# Altium PCB PCB_USB_Board_v2.3.PcbDoc
Units mil, origin at the board's own origin, x right, y up, seen from the top; angles counter-clockwise.
Board outline 652.87 x 1133.86 mil, 2 copper layers (Top Layer, Bottom Layer), stack 61.811 mil thick; 8 components, 4 nets, 40 pads, 15 vias.
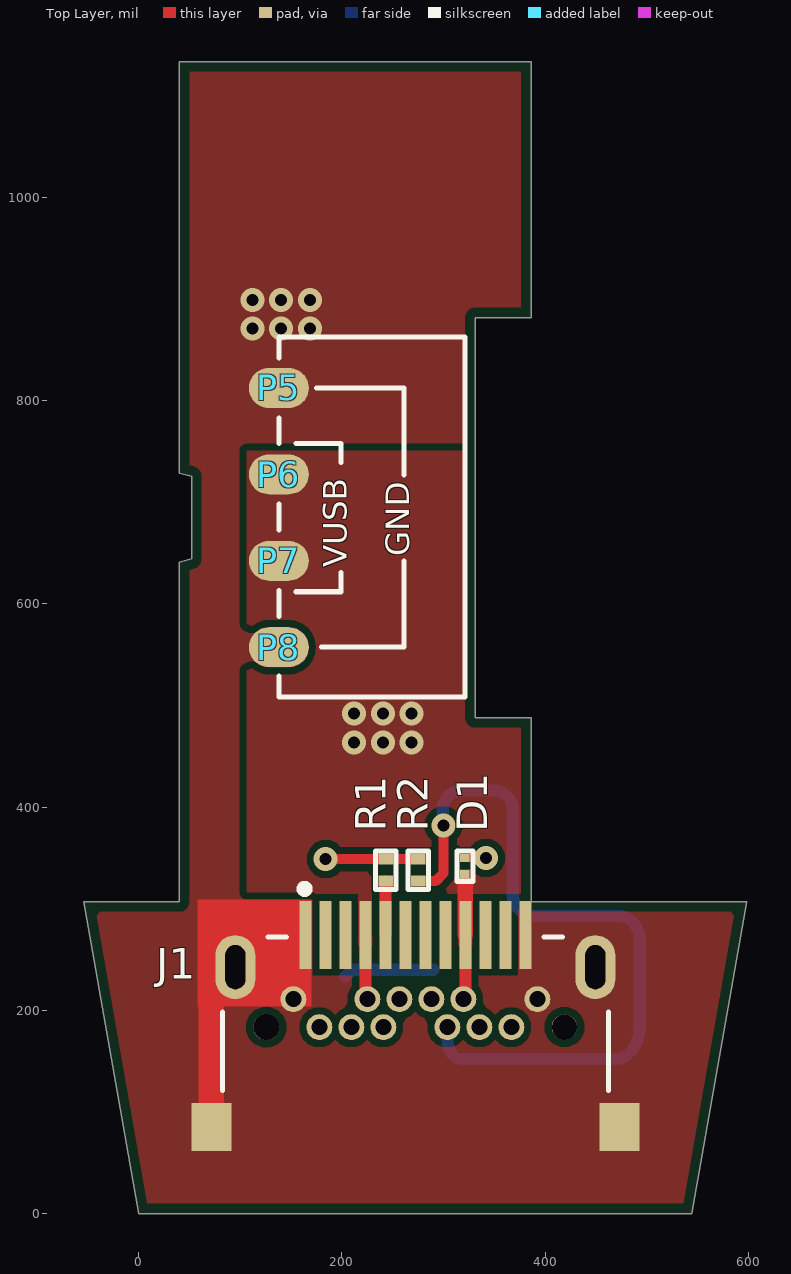
[diagram p0: Top Layer view]
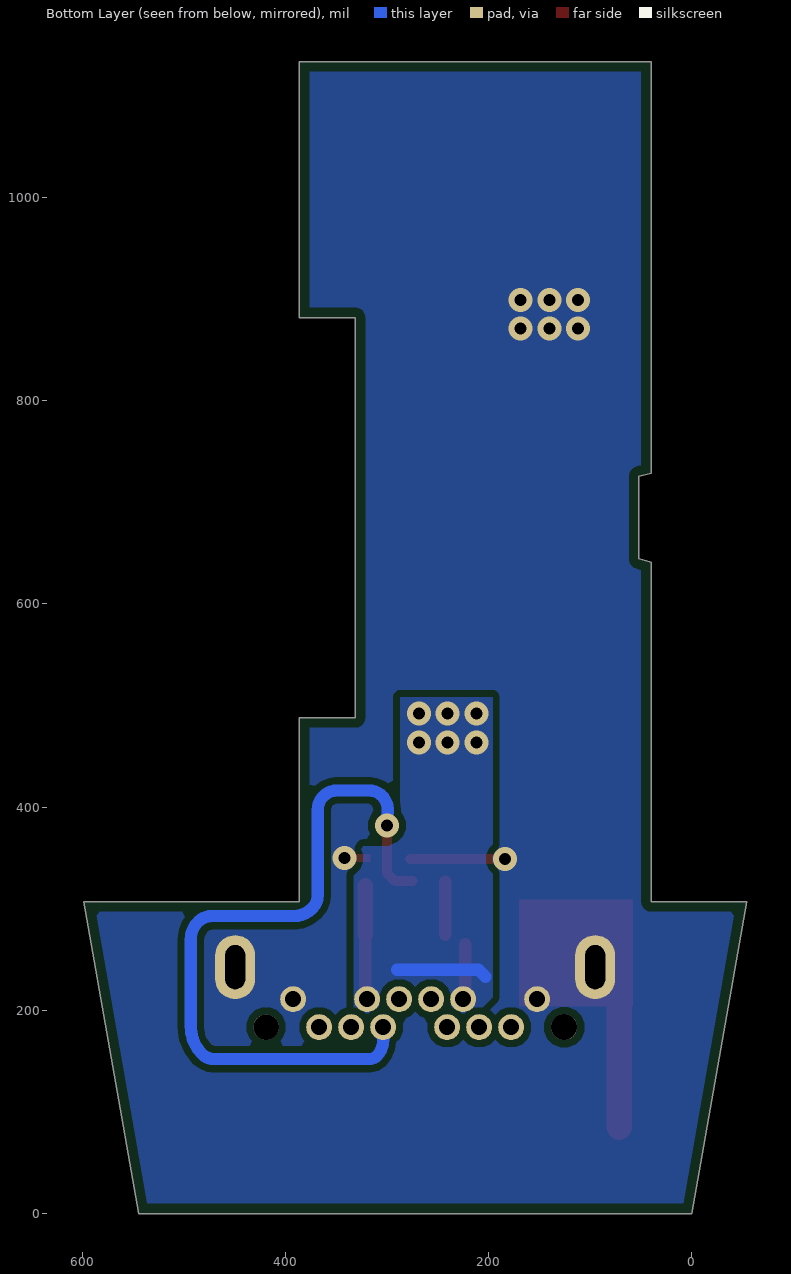
[diagram p1: Bottom Layer view, seen from below]
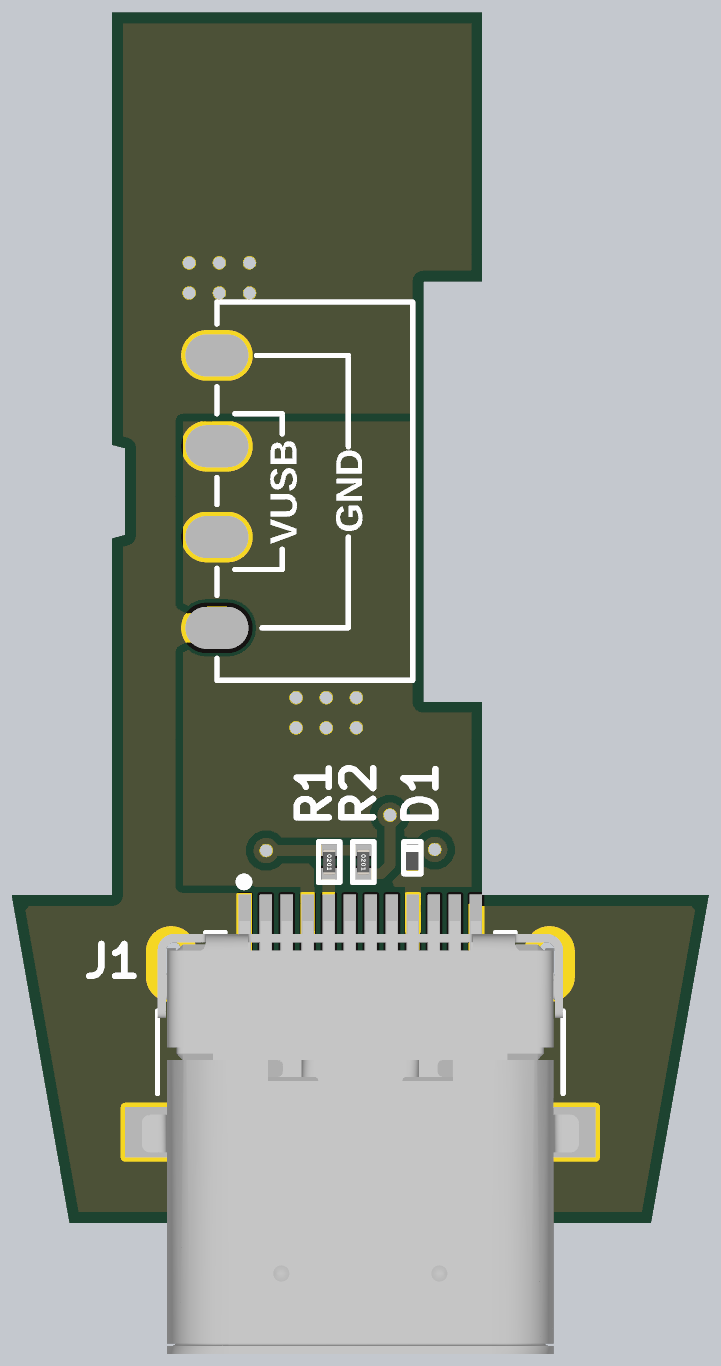
[diagram p2: 3D render of the assembled board from above, using the file's embedded part models]

## Layer stack, top to bottom
Top Solder: solder mask 0.3937, Solder Resist, Dk 3.5
Top Layer: signal copper 1.378
Dielectric 1: core 59.0551, FR-4, Dk 4.8
Bottom Layer: signal copper 1.378
Bottom Solder: solder mask 0.3937, Solder Resist, Dk 3.5

## Board outline
-0.17,-0.08 -54.31,307.01 39.84,307.01 39.84,641.16 52,644.41 52,725.5 39.84,728.76 39.84,1133.78 386.29,1133.78 386.29,881.81 331.17,881.81 331.17,488.11 386.29,488.11 386.29,307.01 598.55,307.01 544.41,-0.08 441,-0.08 440.75,-0.08 59.75,-0.08 60,-0.08

## Design rules (kind name [scope] priority, off if disabled: settings)
BoardOutlineClearance [All] p1: gap=0 ignorepadtopadclearanceinfootprint=FALSE except(10: Poly-OutlineEdge)
Clearance [All] p1: gap=7 ignorepadtopadclearanceinfootprint=FALSE except(5: Arc-SMDPad Track-SMDPad SMDPad-SMDPad THPad-THPad)
HoleSize [All] p1: absolutevalues=TRUE maxlimit=1000 minlimit=1 maxpercent=80.000 minpercent=20.000
HoleToHoleClearance [All] p1: gap=2 allowstackedmicrovias=TRUE
MinimumSolderMaskSliver [All] p1: minsoldermaskwidth=2
PolygonConnect [All] p1: connectstyle=Direct reliefconductorwidth=10 reliefentries=4 polygonreliefangle="90 Angle" airgapwidth=10
RoutingVias [All] p1: holewidth=11.81 width=23.62 viastyle="Through Hole" minholewidth=11.81 minwidth=23.62 maxholewidth=11.81 maxwidth=23.62
SilkToSilkClearance [All] p1: silktosilkclearance=0
SilkToSolderMaskClearance [IsPad] p1: minsilkscreentomaskgap=0 clearancetoexposedcopper=TRUE
SolderMaskExpansion [All] p1: expansion=4 istentingtop=FALSE
SupplyNets "Schematic Supply Nets_1" [InNet('VUSB')] p1: voltage=0.000
SupplyNets "Schematic Supply Nets" [InNet('GND')] p2: voltage=0.000
Width [All] p1: maxlimit=100 minlimit=6 preferedwidth=12 minimp=50.000000 maximp=50.000000 favimp=50.000000
25 further rules are at their usual default settings.

## Classes and differential pairs
component class USB-Sheet: D1 J1 R1 R2

## Components (designator, comment, footprint, x,y, rotation, side; value= is the part's Value field where it differs from the comment)
D1 "PESD5V0H1BSFYL" DSN0603-2 321,342 r270 top
J1 "UJ32-C-H-G-H2-SMT-TR" CUI_UJ32-C-H-G-H2-SMT-TR 272.21,55.47 r0 top locked
P5 "TEST POINT 0.5mm Dia" "Test-point - 0.5mm" 137.89,812.53 r270 top
P6 "TEST POINT 0.5mm Dia" "Test-point - 0.5mm" 137.89,727.48 r270 top
P7 "TEST POINT 0.5mm Dia" "Test-point - 0.5mm" 137.89,642.44 r270 top
P8 "TEST POINT 0.5mm Dia" "Test-point - 0.5mm" 137.89,557.39 r270 top
R1 "5.1K" Res-0201 243,338 r270 top value=5.1kR
R2 "5.1K" Res-0201 275,338 r270 top value=5.1kR

## Footprints (in the part's own frame and the unit in brackets; to place one, negate y for a bottom-side part, rotate by r counter-clockwise, add the part's x,y. Pads: shape width x height; smd on the part's side, far side on the other; paste and mask are expansions set on the pad)
CUI_UJ32-C-H-G-H2-SMT-TR [mm]
  rect 0.3x1.7 smd mask+0.05: A1(-2.75,5.56) A2(-2.25,5.56) A3(-1.75,5.56) A4(-1.25,5.56) A5(-0.75,5.56) A6(-0.25,5.56) A7(0.25,5.56) A8(0.75,5.56) A9(1.25,5.56) A10(1.75,5.56) A11(2.25,5.56) A12(2.75,5.56)
  round 0.65 hole 0.4: B1(3.05,3.95) B2(2.4,3.25) B3(1.6,3.25) B4(1.2,3.95) B5(0.8,3.25) B6(0.4,3.95) B7(-0.4,3.95) B8(-0.8,3.25) B9(-1.2,3.95) B10(-1.6,3.25) B11(-2.4,3.25) B12(-3.05,3.95)
  rect 1x1.2 smd: SH1(-5.1,0.75) SH2(5.1,0.75)
  oval 1x1.6 hole 0.5 slot 1.1 at 90 deg: SH3(-4.5,4.75) SH4(4.5,4.75)
  round 0.65 hole 0.65 unplated: ""(-3.725,3.25)
  round 0.63 hole 0.63 unplated: ""(3.725,3.25)
  silkscreen extent -4.82,1.67 4.82,6.81, body extent -5.2,-4.53 5.2,5.78, height 3.52
DSN0603-2 [mm]
  rect 0.2x0.24 smd mask+0.055: 1(-0.2,0) 2(0.2,0)
  silkscreen extent -0.38,-0.2 0.38,0.2, body extent -0.3,-0.15 0.3,0.15, height 0.32
Res-0201 [mm]
  rect 0.27x0.37 smd mask+0.055: 1(-0.275,0) 2(0.275,0)
  silkscreen extent -0.48,-0.25 0.48,0.25, body extent -0.3,-0.15 0.3,0.15, height 0.29
"Test-point - 0.5mm" [mm]
  oval 1x1.5 smd: 1(0,0)

## Part data
D1: "5V Clamp 7A (8/20µs) Ipp Tvs Diode Surface Mount DSN0603-2", Digikey Part Number=1727-2675-6-ND, Manufacturer="Nexperia USA Inc.", Package=0603, ComponentLink1Description="Digikey Link", ComponentLink1URL=https://www.digikey.com/en/products/detail/nexperia-usa-inc/PESD5V0H1BSFYL/5981341?s=N4IgTCBcDaIAoFEDKARArANQAwAkCMAQkgGICaAMiALoC%2BQA, Item Type="TVS Diode", Manufacturer Part Number=PESD5V0H1BSFYL
J1: "Type C, USB 3.2 Gen 2x2, 20 Gbps, 20 Vac, 5 A, Right Angle, Gold Flash, Surface Mount, Black Insulator, USB Receptacle", Package=None, Check_prices=https://www.snapeda.com/parts/UJ32-C-H-G-H2-SMT-TR/CUI+Devices/view-part/?ref=eda, CUI_purchase_URL=https://www.cuidevices.com/product/interconnect/connectors/usb-connectors/uj32-c-h-g-h2-smt-tr?utm_source=snapeda.com&utm_medium=referral&utm_campaign=snapedaBOM, MF="CUI Devices", MP=UJ32-C-H-G-H2-SMT-TR, SnapEDA_Link=https://www.snapeda.com/parts/UJ32-C-H-G-H2-SMT-TR/CUI+Devices/view-part/?ref=snap
P5 P6 P7 P8: "Test Point ON", Item Type="Test Point", Manufacturer Part Number="TEST POINT 0.5mm Dia"
R1 R2: library part RC0201FR-075K1L, "RES 5.1K OHM 1% 1/20W 0201", Case Code (Imperial)=0201, Case Code (Metric)=0603, Digikey Part Number=YAG2741DKR-ND, LCSC Part Number=C274341, Manufacturer=Yageo, Max Operating Temperature=125°C, Max Power Dissipation=50mW, Min Operating Temperature=-55°C, Supplier Part Number=9072847, Temperature Coefficient=200ppm/°C, Tolerance=1%, Voltage Rating=25V, Case/Package=0201, Category="Chip SMD Resistors", ComponentLink1Description=http://www.mouser.com/ds/2/447/RC0201-559633.pdf?src-supplier=Mouser, ComponentLink1URL=http://www.mouser.com/ds/2/447/RC0201-559633.pdf?src-supplier=Mouser, ComponentLink2Description=https://datasheet.octopart.com/RC0201FR-075K1L-Yageo-datasheet-164759695.pdf?src-supplier=Future+Electronics, ComponentLink2URL=https://datasheet.octopart.com/RC0201FR-075K1L-Yageo-datasheet-164759695.pdf?src-supplier=Future+Electronics, ComponentLink3Description=http://www.yageo.com/documents/recent/PYu-RC_Group_51_RoHS_L_10.pdf?src-supplier=Digi-Key, ComponentLink3URL=http://www.yageo.com/documents/recent/PYu-RC_Group_51_RoHS_L_10.pdf?src-supplier=Digi-Key, Features="Moisture Resistant", Height=0.23mm, Item Type=Resistor, Lead Free="Lead Free", Length=0.6mm, Manufacturer Part Number=RC0201FR-075K1L, Number of Terminations=2, Packaging="Tape and Reel", Power Rating=50mW, Pricing="10000=0.0014, 40000=0.0013, 200000=0.0013, 400000=0.0012, 1250000=0.0011 (USD)", RoHS=Yes, RoHS Compliant=Yes, Series=RC, Stock=280000, Supplier="Future Electronics", Termination=SMD/SMT, Width=0.3mm

## Via types
v1: diameter 23.62, hole 11.81, Top Layer to Bottom Layer, tented both sides, 15 vias

## Nets (pads, with @x,y where several pads share a name; then routed paths per layer and width w, separated by ;. In a path a pad name is that pad's centre, name@x,y a point inside that pad or via, vN(x,y) a via of type N, cw(c..) or ccw(c..) an arc to the next point about the centre after c; other vN are vias at no path point)
GND: D1.1 J1.A1 J1.A12 J1.B1 J1.B12 J1.SH1 J1.SH2 J1.SH3 J1.SH4 P5.1 P8.1 R1.1 R2.1 | length 262.3
  Top Layer w10: v1(184,348.83) 243,348.94 R2.1@275,349 ; R2.1@275,348.99 277,349 R2.1@275,349
  Top Layer w25: J1.SH1 71.43,208.84 95.05,232.46 J1.SH3
  other v1: 341.89,349.81 111.92,871 140.17,871 168.42,871 111.92,899.25 140.17,899.25 168.42,899.25
NetJ1_A5: J1.A5 R1.2 | length 52.8
  Top Layer w10: R1.2@242.68,326.68 R1.2@243,327
  Top Layer w12: J1.A5 R1.2@242.68,326.68
NetJ1_B5: J1.B5 R2.2 | length 733.7
  Top Layer w10: R2.2 292.17,327.17 300,335 v1(300,382)
  Bottom Layer w12.01: v1(300,382) 299.2,397.31 299.18,397.63 299.18,397.94 299.18,398.1 cw(c317.88,397.71) 317.88,416.41 349.15,416.41 cw(c349.15,397.56) 368,397.56 368,381.17 368,313.07 ccw(c385.07,313.07) 373,301 ; J1.B5 303.71,170.19 ccw(c325.19,170.19) 310,155 ccw(c317.24,162.24) 317.24,152 469.93,152 ccw(c469.93,169.07) 482,157 ccw(c455.44,183.56) 493,183.56 493,270.1 ccw(c469.1,270.1) 486,287 ccw(c471.99,272.99) 471.99,292.8 391.38,292.8 cw(c391.38,317.38) 374,300
VUSB: D1.2 J1.A4 J1.A9 J1.B4 J1.B9 P6.1 P7.1 | length 261.5
  Top Layer w12: J1.B9@223,215.74 J1.A4@223,265 ; J1.B4@321.43,214.86 J1.A9
  Top Layer w15: J1.B9@223,212.95 J1.B9 cw(c229.72,215.74) J1.B9@223,215.74 ; J1.B4@319,209 ccw(c313.14,214.86) J1.B4@321.43,214.86 ; J1.A9 321.43,322.63
  Bottom Layer w12: 202.97,232.97 210,240 290,240
  other v1: 212,463.75 240.25,463.75 268.5,463.75 212,492 240.25,492 268.5,492
pads on no net: J1. J1.A2 J1.A3 J1.A6 J1.A7 J1.A8 J1.A10 J1.A11 J1.B2 J1.B3 J1.B6 J1.B7 J1.B8 J1.B10 J1.B11

## Polygon pours and split planes (outlines as drawn)
VUSB on Bottom Layer "VUSB_L02_P000" (solid, remove dead copper, pour order 0): 286.99,508.2 286.99,372.46 297.89,361.55 332.88,361.55 332.88,197 212,197 196,213 196,508.2
GND on Bottom Layer "GND_L02_P003" (solid, remove dead copper, pour order 3): 39.84,1133.78 386.29,1133.78 386.29,881.81 331.17,881.81 331.17,488.11 386.29,488.11 386.29,307.01 598.55,307.01 586,236 576,174 544.41,-0.08 441,-0.08 441,-69.8 443.45,-69.8 440.17,-73.07 440.17,-0.08 60.25,-0.08 60,-0.08 -0.17,-0.08 -3,18 -10,57 -22,123 -34,193 -45,255 -54.31,307.01 -34,307 39.84,307.01 39.84,641.16 52,644.41 52,725.5 39.84,728.76
VUSB on Top Layer "NONET_L-01_P-001" (solid, remove dead copper, pour order 2): 327,750.79 327,488.11 386.29,488.11 386.29,263.7 106.11,263.7 106.11,631.62 106.11,750.79
GND on Top Layer "GND_L01_P004" (solid, remove dead copper, pour order 4): 39.84,1133.78 386.29,1133.78 386.29,881.81 331.17,881.81 331.17,488.11 386.29,488.11 386.29,307.01 598.55,307.01 586,236 576,174 544.41,-0.08 441,-0.08 441,-69.8 443.45,-69.8 440.17,-73.07 440.17,-0.08 60,-0.08 60,-117.94 60,-0.08 -0.17,-0.08 -3,18 -10,57 -22,123 -34,193 -45,255 -54.31,307.01 -34,307 39.84,307.01 39.84,641.16 52,644.41 52,725.5 39.84,728.76

## Other copper
Top Layer:
  rectangle net GND: 316.28,345.94 352,353.81
  region net GND: 170,309 58,309 58,204 170,204

## Silkscreen, mask and mechanical layers (free items; w line width, h text height)
Top Overlay:
  lines w5: 137.89,528.84 137.89,508.2 321.17,508.2 321.17,862.53 137.89,862.53 137.89,841.88 ; 137.89,587.84 137.89,613.08 ; 137.89,672.88 137.89,698.12 ; 137.89,757.93 137.89,783.17 ; 154.7,611.99 199,611.99 199,630.92 ; 154.7,757.93 199,757.93 199,739 ; 175,812.53 261,812.53 261,727.02 ; 180,557.39 261,557.39 261,642.44
  text "GND" at 273.94,646.68 h40 r90
  text "VUSB" at 212.41,635.87 h40 r90
Dimensions:
  drawing of 8695 lines, arcs and shapes, not listed
Board Shape:
  lines w10: 59.75,-0.08 440.75,-0.08 ; 60,-0.08 -0.17,-0.08 -54.31,307.01 39.84,307.01 39.84,641.16 52,644.41 52,725.5 39.84,728.76 39.84,1133.78 386.29,1133.78 386.29,881.81 331.17,881.81 331.17,488.11 386.29,488.11 386.29,307.01 598.55,307.01 544.41,-0.08 441,-0.08
Fabrication Info:
  drawing of 191 lines, arcs and shapes, not listed
  text "Layer" at 1269.34,608 h60
  text "Name" at 1679.26,608 h60
  text "Material" at 2609,608 h60
  text "Thickness" at 3468.77,608 h60
  text "Constant" at 4118.6,608 h60
  text "Board Layer Stack" at 4688.46,608 h60
  text "Top Overlay" at 1679.26,488 h60
  text "Top Solder" at 1679.26,368 h60
  text "Solder Resist" at 2609,368 h60
  text "0.39mil" at 3468.77,368 h60
  text "3.5" at 4118.6,368 h60
  text "1" at 1269.34,248 h60
  text "Top Layer" at 1679.26,248 h60
  text "1.38mil" at 3468.77,248 h60
  text "Dielectric 1" at 1679.26,128 h60
  text "FR-4" at 2609,128 h60
  text "59.06mil" at 3468.77,128 h60
  text "4.8" at 4118.6,128 h60
  text "2" at 1269.34,8 h60
  text "Bottom Layer" at 1679.26,8 h60
  text "1.38mil" at 3468.77,8 h60
  text "Bottom Solder" at 1679.26,-112 h60
  text "Solder Resist" at 2609,-112 h60
  text "0.39mil" at 3468.77,-112 h60
  text "3.5" at 4118.6,-112 h60
  text "Bottom Overlay" at 1679.26,-232 h60
  text "Total board thickness:" at 1269.34,-352 h60
  text "62.60mil" at 3468.77,-352 h60
Drill Drawing:
  circle w10: c997.48,1437.33 r33.33
  lines w10: 964.14,1554 1030.81,1554 1030.81,1620.67 964.14,1620.67 964.14,1554 ; 964.14,1720.67 980.81,1720.67 997.48,1704 1014.14,1720.67 1030.81,1720.67 1014.14,1737.33 1030.81,1754 1014.14,1754 997.48,1770.67 980.81,1754 964.14,1754 980.81,1737.33 964.14,1720.67 ; 964.14,1920.67 1030.81,1920.67 997.48,1854 964.14,1920.67 ; 964.14,2004 997.48,2020.67 1030.81,2004 1014.14,2037.33 1030.81,2070.67 997.48,2054 964.14,2070.67 980.81,2037.33 964.14,2004
  lines w15: 904.35,1359 10761.61,1359 ; 904.35,2109 10761.61,2109 ; 1455.23,1209 1455.23,2259 ; 1985.09,1209 1985.09,2259 ; 3084.77,1209 3084.77,2259 ; 3590.65,1209 3590.65,2259 ; 4324.45,1209 4324.45,2259 ; 5824,1209 5824,2259 ; 6413.85,1209 6413.85,2259 ; 7159.65,1209 7159.65,2259 ; 8289.32,1209 8289.32,2259 ; 9359.01,1209 9359.01,2259 ; 904.35,1209 10761.61,1209 10761.61,2259 904.35,2259 904.35,1209
  text "Symbol" at 994.35,2154 h72
  text "Count" at 1500.23,2154 h72
  text "Hole Size" at 2030.09,2154 h72
  text "Plated" at 3129.77,2154 h72
  text "Hole Type" at 3635.65,2154 h72
  text "Drill Layer Pair" at 4369.45,2154 h72
  text "Via/Pad" at 5869,2154 h72
  text "Pad Shape" at 6458.85,2154 h72
  text "Template" at 7204.65,2154 h72
  text "Hole Length" at 8334.32,2154 h72
  text "Routed Path Length" at 9404.01,2154 h72
  text "15" at 1500.23,2004 h60
  text "11.81mil (0.300mm)" at 2030.09,2004 h60
  text "PTH" at 3129.77,2004 h60
  text "Round" at 3635.65,2004 h60
  text "Top Layer - Bottom Layer" at 4369.45,2004 h60
  text "Via" at 5869,2004 h60
  text "Rounded" at 6458.85,2004 h60
  text "v60h30m0mx0" at 7204.65,2004 h60
  text "-" at 8334.32,2004 h60
  text "-" at 9404.01,2004 h60
  text "12" at 1500.23,1854 h60
  text "15.75mil (0.400mm)" at 2030.09,1854 h60
  text "PTH" at 3129.77,1854 h60
  text "Round" at 3635.65,1854 h60
  text "Top Layer - Bottom Layer" at 4369.45,1854 h60
  text "Pad" at 5869,1854 h60
  text "Rounded" at 6458.85,1854 h60
  text "c65h40" at 7204.65,1854 h60
  text "-" at 8334.32,1854 h60
  text "-" at 9404.01,1854 h60
  text "2" at 1500.23,1704 h60
  text "19.69mil (0.500mm)" at 2030.09,1704 h60
  text "PTH" at 3129.77,1704 h60
  text "Slot" at 3635.65,1704 h60
  text "Top Layer - Bottom Layer" at 4369.45,1704 h60
  text "Pad" at 5869,1704 h60
  text "Rounded" at 6458.85,1704 h60
  text "r160_100h50_110r50" at 7204.65,1704 h60
  text "43.31mil (1.100mm)" at 8334.32,1704 h60
  text "23.62mil (0.600mm)" at 9404.01,1704 h60
  text "1" at 1500.23,1554 h60
  text "24.80mil (0.630mm)" at 2030.09,1554 h60
  text "NPTH" at 3129.77,1554 h60
  text "Round" at 3635.65,1554 h60
  text "Top Layer - Bottom Layer" at 4369.45,1554 h60
  text "Pad" at 5869,1554 h60
  text "Rounded" at 6458.85,1554 h60
  text "c63hn63" at 7204.65,1554 h60
  text "-" at 8334.32,1554 h60
  text "-" at 9404.01,1554 h60
  text "1" at 1500.23,1404 h60
  text "25.59mil (0.650mm)" at 2030.09,1404 h60
  text "NPTH" at 3129.77,1404 h60
  text "Round" at 3635.65,1404 h60
  text "Top Layer - Bottom Layer" at 4369.45,1404 h60
  text "Pad" at 5869,1404 h60
  text "Rounded" at 6458.85,1404 h60
  text "c65hn65" at 7204.65,1404 h60
  text "-" at 8334.32,1404 h60
  text "-" at 9404.01,1404 h60
  text "31 Total" at 1500.23,1254 h60
  text "Slot definitions :" at 994.35,1109.03 h60
  text "Routed Path Length" at 2027.04,1109.03 h60
  text "= Calculated from tool start centre position to tool end centre position." at 3129.71,1109.03 h60
  text "Hole Length" at 2027.04,1009.05 h60
  text "= Routed Path Length + Tool Size = Slot length as defined in the PCB layout" at 2719.84,1009.05 h60

## Dimensions
39.84,1133.78 to 67.4,-118.19 on Dimensions
386.29,1133.78 to 39.84,1133.78 on Dimensions
331.17,488.11 to 331.17,881.81 on Dimensions

## Text inside footprints (layer, text, board x,y; h text height)
J1: Fabrication Info "PCB Edge" at 189,65 h24